# Altium PCB TuringSMD.PcbDoc (part 1 of 2)
Units mil, origin at the board's own origin, x right, y up, seen from the top; angles counter-clockwise.
Board outline 1102.36 x 3937.01 mil, 2 copper layers (Top Layer, Bottom Layer); 69 components, 85 nets, 266 pads, 122 vias.
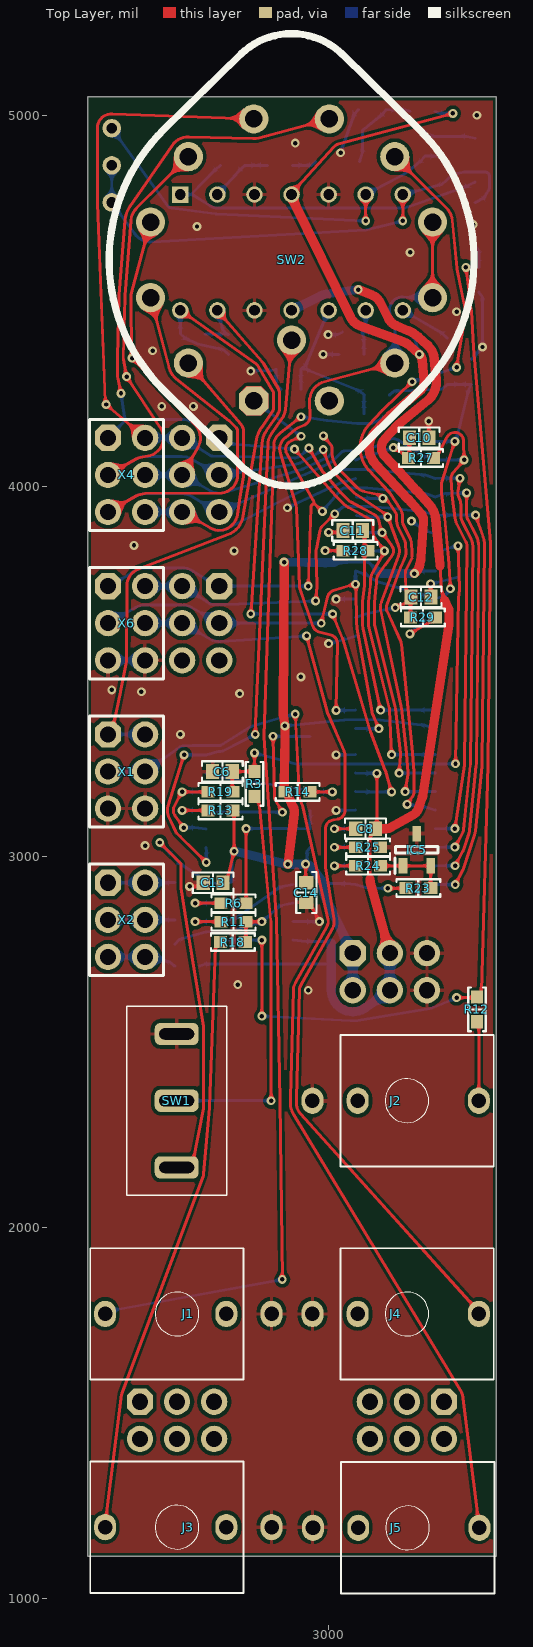
[diagram p0: Top Layer view]
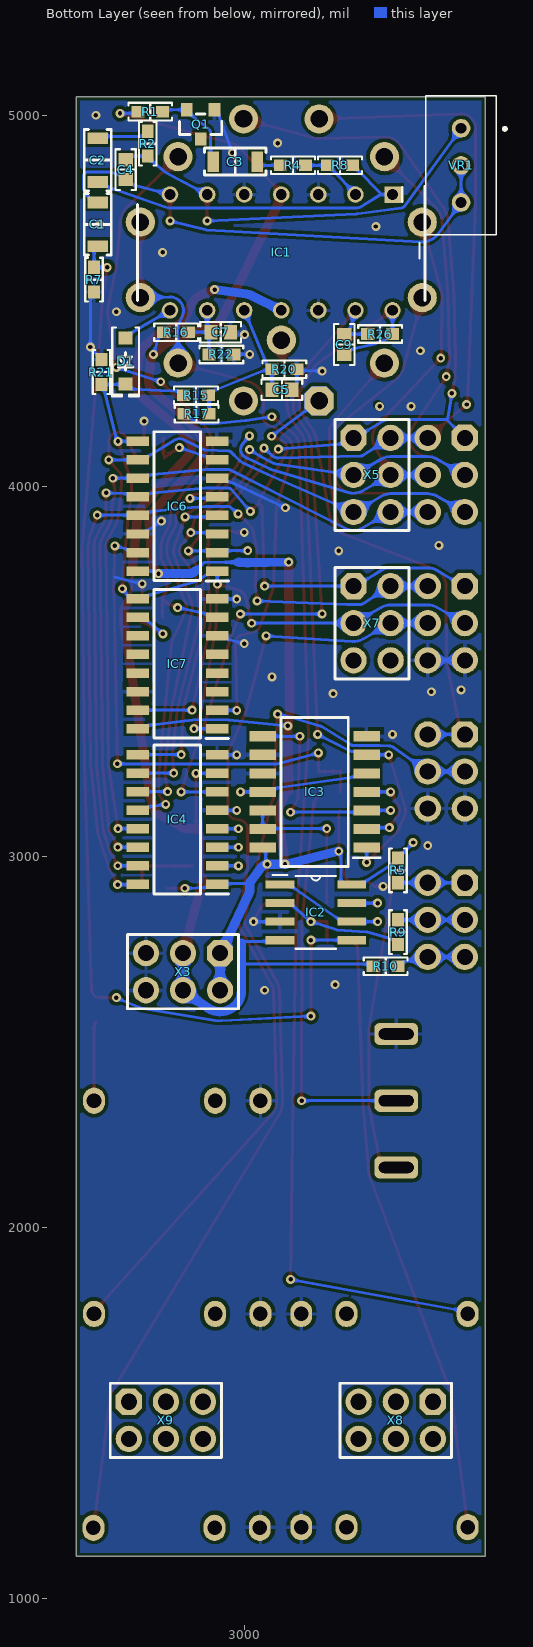
[diagram p1: Bottom Layer view, seen from below]
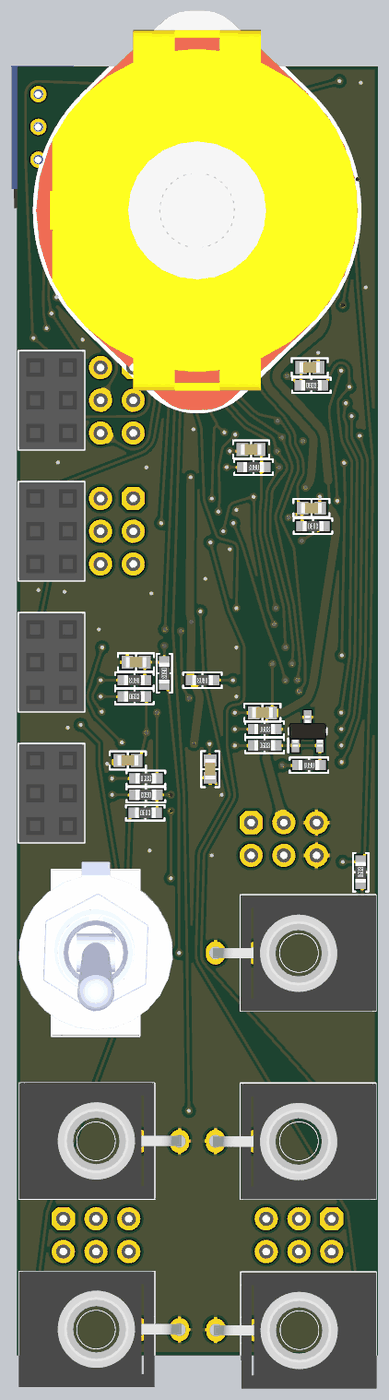
[diagram p3: 3D render of the assembled board from above, using the file's embedded part models]
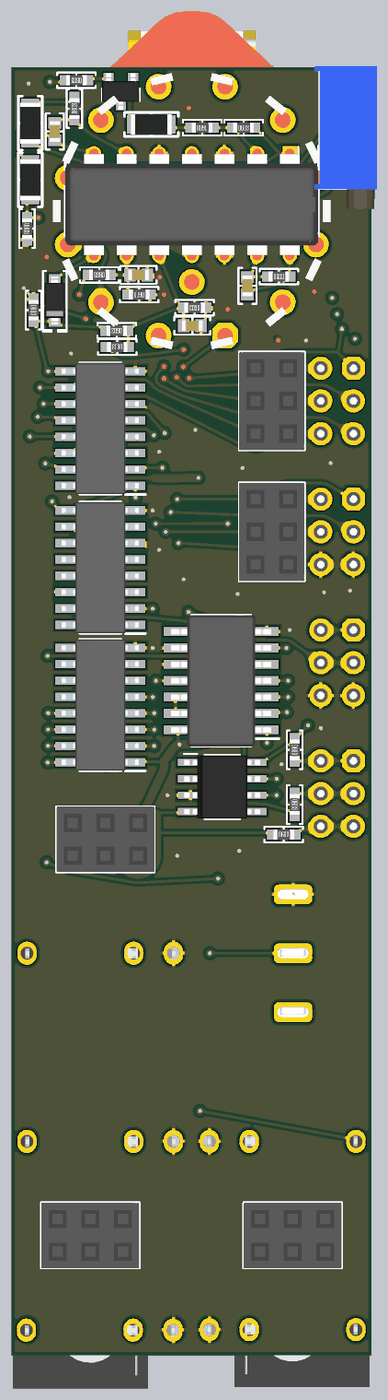
[diagram p4: 3D render of the assembled board from below, using the file's embedded part models]

## Layer stack, top to bottom
Top Solder: solder mask 0.4, Solder Resist, Dk 3.5
Top Layer: signal copper 1.4
Dielectric 1: dielectric 12.6, FR-4, Dk 4.8
Bottom Layer: signal copper 1.4
Bottom Solder: solder mask 0.4, Solder Resist, Dk 3.5

## Board outline
2350,1112.99 2350,5050 3452.36,5050 3452.36,1112.99

## Design rules (kind name [scope] priority, off if disabled: settings)
BoardOutlineClearance [All] p1: gap=10 ignorepadtopadclearanceinfootprint=FALSE except(0: Arc-SplitContinuation Track-SplitContinuation SMDPad-SplitContinuation THPad-SplitContinuation Via-SplitContinuation Fill-SplitContinuation Poly-SplitContinuation Region-SplitContinuation Text-SplitContinuation)
Clearance [All] p1: gap=10 ignorepadtopadclearanceinfootprint=FALSE except(7: Arc-SMDPad Track-SMDPad; 8: Arc-Arc Arc-Track Arc-Via Arc-Fill Arc-Poly Arc-Region Track-Track Track-Via Track-Fill Track-Poly Track-Region SMDPad-SMDPad SMDPad-Fill SMDPad-Poly SMDPad-Region)
PolygonConnect [All] p1: thpad.connectstyle=Relief thpad.reliefconductorwidth=10 thpad.reliefentries=4 thpad.polygonreliefangle="90 Angle" thpad.airgapwidth=10 smdpad.connectstyle=Relief smdpad.reliefconductorwidth=10 smdpad.reliefentries=4 smdpad.polygonreliefangle="90 Angle" smdpad.airgapwidth=10 via.connectstyle=Direct via.reliefconductorwidth=10 via.reliefentries=4 via.polygonreliefangle="90 Angle" via.airgapwidth=10
RoutingVias [All] p1: holewidth=12 width=24 viastyle="Through Hole" minholewidth=12 minwidth=24 maxholewidth=12 maxwidth=24
SolderMaskExpansion [All] p1: expansion=4 istentingtop=FALSE
Width [All] p1: maxlimit=25 minlimit=8 preferedwidth=8
30 further rules are at their usual default settings.

## Components (designator, comment, footprint, x,y, rotation, side; value= is the part's Value field where it differs from the comment)
C1 "0.47 µF" "CAP FILM 1206" 3395,4705.94 r270 bottom
C2 "0.47 µF" "CAP FILM 1206" 3395,4879.06 r90 bottom
C3 "0.47 µF" "CAP FILM 1206" 3024.06,4875 r180 bottom
C4 "1000 pF" "CAP 0603_1608" 3320,4853.43 r270 bottom
C5 "330 pF" "CAP 0603_1608" 2898.43,4260 r0 bottom
C6 "1000 pF" "CAP 0603_1608" 2713.43,3230 r0 top
C7 "0.1 µF" "CAP 0603_1608" 3063.43,4415 r0 bottom
C8 "10000 pF" "CAP 0603_1608" 3099.65,3075.65 r180 top
C9 "1000 pF" "CAP 0603_1608" 2730,4381.57 r270 bottom
C10 "1000 pF" "CAP 0603_1608" 3244.22,4130.65 r180 top
C11 "1000 pF" "CAP 0603_1608" 3065,3880 r0 top
C12 "1000 pF" "CAP 0603_1608" 3249.22,3700.65 r180 top
C13 "0.1 µF" "CAP 0603_1608" 2688.43,2930 r0 top
C14 "0.1 µF" "CAP 0603_1608" 2940,2903.43 r90 top
D1 "1N4148W-TP" SOD-123 3320,4337.01 r270 bottom
IC1 "TL074CN" DIP794W53P254L1930H508Q14N 2900,4630 r270 bottom
IC2 "TL072ACP" SOIC-8 2807,2850 r180 bottom
IC3 "CD4016BNSR" SOIC127P780X200-14N 2810,3175 r0 bottom
IC4 "DAC0800LCM_NOPB" SOIC127P600X175-16N 3180.36,3100.65 r0 bottom
IC5 "TL431MFDT,215" SOT95P230X110-3N 3237.76,3018.95 r90 top
IC6 "CD4015BM96" SOIC127P600X175-16N 3180.36,3945.65 r0 bottom
IC7 "CD4015BM96" SOIC127P600X175-16N 3180.36,3520.65 r0 bottom
J1 "CLOCK" THONKICONN 2846.06,1766.89 r90 top
J2 "NOISE_OUT" THONKICONN 2956.3,2342.05 r270 top
J3 "CV_IN" THONKICONN 2846.06,1191.73 r90 top
J4 "PULSE_OUT" THONKICONN 2956.3,1766.89 r270 top
J5 "CV OUT" THONKICONN 2957.95,1190 r270 top
Q1 "MMBT3904-7-F" "DIODES SOT-23-3" 3117.6,4975.63 r270 bottom
R1 "100 kOhms" "YAGEO RES 0603_1608" 3253.46,5010 r0 bottom
R2 "1 kOhms" "YAGEO RES 0603_1608" 3260,4923.46 r90 bottom
R3 "1 kOhms" "YAGEO RES 0603_1608" 2800,3196.54 r270 top
R4 "10 kOhms" "YAGEO RES 0603_1608" 2868.46,4865 r0 bottom
R5 "10 kOhms" "YAGEO RES 0603_1608" 2585,2963.46 r270 bottom
R6 "100 kOhms" "YAGEO RES 0603_1608" 2743.46,2875 r0 top
R7 "100 kOhms" "YAGEO RES 0603_1608" 3405,4556.54 r270 bottom
R8 "470 kOhms" "YAGEO RES 0603_1608" 2741.54,4865 r180 bottom
R9 "100 kOhms" "YAGEO RES 0603_1608" 2585,2796.54 r270 bottom
R10 "10 kOhms" "YAGEO RES 0603_1608" 2618.46,2705 r180 bottom
R11 "47 kOhms" "YAGEO RES 0603_1608" 2743.46,2825 r180 top
R12 "1 kOhms" "YAGEO RES 0603_1608" 3400,2588.46 r90 top
R13 "10 kOhms" "YAGEO RES 0603_1608" 2708.46,3125 r0 top
R14 "10 kOhms" "YAGEO RES 0603_1608" 2916.54,3175 r180 top
R15 "470 kOhms" "YAGEO RES 0603_1608" 3130,4245 r0 bottom
R16 "68 kOhms" "YAGEO RES 0603_1608" 3183.46,4415 r0 bottom
R17 "15 kOhms" "YAGEO RES 0603_1608" 3128.46,4195 r0 bottom
R18 "51 kOhms" "YAGEO RES 0603_1608" 2741.54,2770 r0 top
R19 "10 kOhms" "YAGEO RES 0603_1608" 2708.46,3175 r180 top
R20 "100 kOhms" "YAGEO RES 0603_1608" 2891.54,4315 r0 bottom
R21 "10 kOhms" "YAGEO RES 0603_1608" 3385,4307.48 r270 bottom
R22 "15 kOhms" "YAGEO RES 0603_1608" 3061.54,4355 r0 bottom
R23 "3.3 kOhms" "YAGEO RES 0603_1608" 3241.9,2915.65 r180 top
R24 "1.6 kOhms" "YAGEO RES 0603_1608" 3106.54,2975.65 r0 top
R25 "1.6 kOhms" "YAGEO RES 0603_1608" 3106.54,3025.65 r0 top
R26 "5.1 kOhms" "YAGEO RES 0603_1608" 2633.46,4410 r180 bottom
R27 "10 kOhms" "YAGEO RES 0603_1608" 3249.18,4075.65 r0 top
R28 "10 kOhms" "YAGEO RES 0603_1608" 3072.68,3825.65 r180 top
R29 "10 kOhms" "YAGEO RES 0603_1608" 3254.18,3645.65 r0 top
SW1 "Toggle SW" "TOGGLE SW" 2590,2342.05 r0 top
SW2 "SW Rotary" SW_ROTARY 2900,4610 r180 top
VR1 "1meg" 3296X1223LF 2415,4865 r0 bottom
X1 "Connector, 6pin, 2.54mm, 500VAC, 3A" "CON: PBD-6"#1 2455,3230 r270 top
X2 "Connector, 6pin, 2.54mm, 500VAC, 3A" "CON: PBD-6"#1 2455,2830 r270 top
X3 "Connector, 6pin, 2.54mm, 500VAC, 3A" "CON: PBD-6"#1 3165,2690 r0 bottom
X4 "Connector, 6pin, 2.54mm, 500VAC, 3A" "CON: PBD-6"#1 2455,4030 r270 top
X5 "Connector, 6pin, 2.54mm, 500VAC, 3A" "CON: PBD-6"#1 2655,4030 r270 bottom
X6 "Connector, 6pin, 2.54mm, 500VAC, 3A" "CON: PBD-6"#1 2455,3630 r270 top
X7 "Connector, 6pin, 2.54mm, 500VAC, 3A" "CON: PBD-6"#1 2655,3630 r270 bottom
X8 "Connector, 6pin, 2.54mm, 500VAC, 3A" "CON: PBD-6"#1 2591.14,1480 r0 bottom
X9 "Connector, 6pin, 2.54mm, 500VAC, 3A" "CON: PBD-6"#2 3211.22,1480 r180 bottom

## Footprints (in the part's own frame and the unit in brackets; to place one, negate y for a bottom-side part, rotate by r counter-clockwise, add the part's x,y. Pads: shape width x height; smd on the part's side, far side on the other; paste and mask are expansions set on the pad)
3296X1223LF [mm]
  round 1.269 hole 0.74: 1(0,-2.54) 2(0,0) 3(0,2.54)
  silkscreen extent -3.1,-4.76 2.41,4.76, body extent -2.07,-4.75 2.76,6.3, height 10.03
"CAP 0603_1608" [mm] "Chip Capacitor, 2-Leads, Body 1.60x0.80mm, IPC Medium Density"
  rect 0.9x1 smd: 1(-0.675,0) 2(0.675,0)
  silkscreen extent -1.4,-0.7 1.4,0.7, body extent -0.8,-0.41 0.8,0.41, height 0.82
"CAP FILM 1206" [mm] "H1, Film Capacitor PPS, 2-Leads, Body 3.20x1.60mm, IPC Medium Density"
  rect 0.8x1.4 smd: 1(-1.5,0) 2(1.5,0)
  silkscreen extent -2.1,-0.92 2.1,0.92, body extent -1.6,-0.8 1.6,0.8, height 1
"CON: PBD-6"#1 [mm] "PBD-6"
  oct 1.8x1.8 hole 1.1: 1(-2.54,-1.27)
  round 1.8 hole 1.1: 2(-2.54,1.27) 3(0,-1.27) 4(0,1.27) 5(2.54,-1.27) 6(2.54,1.27)
  silkscreen extent -3.81,-2.54 3.81,2.54, body extent -3.81,-2.54 3.81,2.54, height 8.5
"CON: PBD-6"#2 [mm] "PBD-6"
  oct 1.8x1.8 hole 1.1: 1(-2.54,1.27)
  round 1.8 hole 1.1: 2(-2.54,-1.27) 3(0,1.27) 4(0,-1.27) 5(2.54,1.27) 6(2.54,-1.27)
  silkscreen extent -3.81,-2.54 3.81,2.54, body extent -3.81,-2.54 3.81,2.54, height 8.5
"DIODES SOT-23-3" [mm] "SOT23, 3-Leads, Body 2.90x2.40mm, Pitch 0.95mm, IPC Medium Density"
  rect 0.9x0.8 smd: 1(-1,0.95) 2(-1,-0.95) 3(1,0)
  silkscreen extent -0.7,-1.45 0.7,1.45, body extent -1.41,-1.45 1.41,1.45, height 1.5
DIP794W53P254L1930H508Q14N [mm]
  rect 1.13x1.13 hole 0.73: 1(-3.97,7.62)
  round 1.13 hole 0.73: 2(-3.97,5.08) 3(-3.97,2.54) 4(-3.97,0) 5(-3.97,-2.54) 6(-3.97,-5.08) 7(-3.97,-7.62) 8(3.97,-7.62) 9(3.97,-5.08) 10(3.97,-2.54) 11(3.97,0) 12(3.97,2.54) 13(3.97,5.08) 14(3.97,7.62)
  silkscreen extent -4.53,-9.84 3.3,9.84, body extent -3.94,-9.84 3.94,9.84, height 5.27
SOD-123 [mm] "SOD, 2-Leads, Body 1.55x3.70mm, IPC Medium Density"
  rect 0.9x0.95 smd: 1(-1.575,0) 2(1.575,0)
  silkscreen extent -2.3,-0.92 2.41,0.92, body extent -1.86,-0.78 1.86,0.77, height 1.35
SOIC127P600X175-16N [mm]
  rect 1.55x0.65 smd: 1(-2.725,4.445) 2(-2.725,3.175) 3(-2.725,1.905) 4(-2.725,0.635) 5(-2.725,-0.635) 6(-2.725,-1.905) 7(-2.725,-3.175) 8(-2.725,-4.445) 9(2.725,-4.445) 10(2.725,-3.175) 11(2.725,-1.905) 12(2.725,-0.635) 13(2.725,0.635) 14(2.725,1.905) 15(2.725,3.175) 16(2.725,4.445)
  silkscreen extent -3.5,-5.1 1.6,5.12, body extent -3,-5.1 3,5.1, height 1.75
SOIC127P780X200-14N [mm]
  rect 1.825x0.7 smd: 1(-3.562,3.81) 2(-3.562,2.54) 3(-3.562,1.27) 4(-3.562,0) 5(-3.562,-1.27) 6(-3.562,-2.54) 7(-3.562,-3.81) 8(3.562,-3.81) 9(3.562,-2.54) 10(3.562,-1.27) 11(3.562,0) 12(3.562,1.27) 13(3.562,2.54) 14(3.562,3.81)
  silkscreen extent -4.47,-5.1 2.3,5.1, body extent -3.9,-5.1 3.9,5.1, height 2
SOIC-8 [mil]
  rect 78x22 smd: 1(-97,75) 2(-97,25) 3(-97,-25) 4(-97,-75) 5(97,-75) 6(97,-25) 7(97,25) 8(97,75)
  silkscreen extent -117,-98 54,101, body extent -116,-96 116,96, height 65
SOT95P230X110-3N [mm]
  rect 1.05x0.6 smd: 1(-1.1,0.95) 2(-1.1,-0.95) 3(1.1,0)
  silkscreen extent -1.63,-1.45 0.23,1.5, body extent -1.2,-1.45 1.2,1.45, height 0.95
SW_ROTARY [mm] "RS25 rotary switch from ali"
  oct 2x2 hole 1.2: 1(2.588,9.659)
  round 2 hole 1.2: 2(7.071,7.071) 3(9.659,2.588) 4(9.659,-2.588) 5(7.071,-7.071) 6(2.588,-9.659) 7(-2.588,-9.659) 8(-7.071,-7.071) 9(-9.659,-2.588) 10(-9.659,2.588) 11(-7.071,7.071) 12(-2.588,9.659) A(0,5.5)
  Top Layer region: 1.588,10.159 2.088,10.659 3.088,10.659 3.588,10.159 3.588,9.159 3.088,8.659 2.088,8.659 1.588,9.159
  Bottom Layer region: 1.588,10.159 2.088,10.659 3.088,10.659 3.588,10.159 3.588,9.159 3.088,8.659 2.088,8.659 1.588,9.159
  silkscreen extent -12.5,-15.5 12.5,15.5, body extent -12.5,-15.5 12.5,15.5, height 31
THONKICONN [mm]
  oval 1.8x1.5 hole 1: 1(0,0) 2(0,3.1) 3(0,11.4)
  silkscreen extent -4.5,1.93 4.5,12.42, body extent -4.47,-0.18 4.53,12.45, height 14.5
"TOGGLE SW" [mil] "3 PIN TOGGLE SWITCH SPDT"
  rrect50% 118.11x60 hole 30 slot 94.49 at 0 deg: 1(0,180) 2(0,0) 3(0,-180)
  silkscreen extent -135,-255 135,255, body extent -236,-251 237,278, height 1129
"YAGEO RES 0603_1608" [mm] "Chip Resistor, 2-Leads, Body 1.60x0.80mm"
  rect 0.9x0.8 smd: 1(-0.85,0) 2(0.85,0)
  silkscreen extent -1.5,-0.6 1.5,0.6, body extent -0.8,-0.4 0.8,0.4, height 0.45

## Part data
C1 C2 C3: library part ECP-U1C474MA5, "CAP FILM 0.47UF 20% 16VDC 1206", Device Package="1206 (3216 Metric)", Dielectric Material="Acrylic, Metallized - Stacked", Manufacturer="Panasonic Electronic Components", Operating Temperature="-40°C ~ 85°C", Supplier Part Number 1=PCF1130CT-ND, Tolerance=±20%, Voltage Rating - AC=12V, Voltage Rating - DC=16V, Applications="EMI, RFI Suppression", Capacitance="0.47 µF", ComponentLink1Description=Datasheet, ComponentLink1URL=http://industrial.panasonic.com/www-cgi/jvcr13pz.cgi?E+PZ+3+ABD0012+ECPU1C474MA5+7+WW, ComponentLink2Description="DigiKey Link", ComponentLink2URL=https://www.digikey.com/en/products/detail/panasonic-electronic-components/ECP-U1C474MA5/285450, Features="Low ESR", Height - Seated (Max)="0.063\" (1.60mm)", LastUpdated="6/3/2024 8:14:42 PM", Lifecycle Status=Active, Minimum Order=1, Mounting Type="Surface Mount", Package / Case="1206 (3216 Metric)", Packaging=TapeAndReel, Part Number=ECP-U1C474MA5, Part Status=Active, Price=0.22, Series=ECP-U(A), Size / Dimension="0.126\" L x 0.063\" W (3.20mm x 1.60mm)", Supplier 1=DigiKey, Termination="Solder Pads"
C4 C6 C9 C10 C11 C12: library part C1608X8R1H102K080AA, "CAP CER 1000PF 50V X8R 0603", Device Package="0603 (1608 Metric)", Manufacturer="TDK Corporation", Operating Temperature="-55°C ~ 150°C", Supplier Part Number 1=445-2501-1-ND, Temperature Coefficient=X8R, Tolerance=±10%, Voltage - Rated=50V, Applications="General Purpose", Capacitance="1000 pF", ComponentLink1Description=Datasheet, ComponentLink1URL=https://product.tdk.com/info/en/catalog/datasheets/mlcc_commercial_hightemp_en.pdf?ref_disty=digikey, ComponentLink2Description="DigiKey Link", ComponentLink2URL=https://www.digikey.com/en/products/detail/tdk-corporation/C1608X8R1H102K080AA/927127, Features="High Temperature", LastUpdated="2/9/2024 8:10:30 PM", Lifecycle Status=Active, Minimum Order=1, Mounting Type="Surface Mount, MLCC", Package / Case="0603 (1608 Metric)", Packaging=TapeAndReel, Part Number=C1608X8R1H102K080AA, Part Status=Active, PartId=2708, Price=0.01, Series=C, Size / Dimension="0.063\" L x 0.031\" W (1.60mm x 0.80mm)", Supplier 1=DigiKey, Thickness (Max)="0.035\" (0.90mm)"
C5: library part AC0603JRNPO9BN331, "CAP CER 330PF 50V C0G/NPO 0603", Device Package="0603 (1608 Metric)", Manufacturer=Yageo, Operating Temperature="-55°C ~ 125°C", Ratings=AEC-Q200, Supplier Part Number 1=311-3280-1-ND, Temperature Coefficient="C0G, NP0", Tolerance=±5%, Voltage - Rated=50V, Applications=Automotive, Capacitance="330 pF", ComponentLink1Description=Datasheet, ComponentLink1URL=http://www.yageo.com/NewPortal/_en/search/productDocs.jsp?YageoPartNumber=AC0603JRNPO9BN331, ComponentLink2Description="DigiKey Link", ComponentLink2URL=https://www.digikey.com/en/products/detail/yageo/AC0603JRNPO9BN331/6643266, LastUpdated="2/9/2024 8:10:30 PM", Lifecycle Status=Active, Minimum Order=1, Mounting Type="Surface Mount, MLCC", Package / Case="0603 (1608 Metric)", Packaging=TapeAndReel, Part Number=AC0603JRNPO9BN331, Part Status=Active, PartId=2321, Price=0.01, Series=AC, Size / Dimension="0.063\" L x 0.031\" W (1.60mm x 0.80mm)", Supplier 1=DigiKey, Thickness (Max)="0.035\" (0.90mm)"
C7 C13 C14: library part C0603C104K5RAC7411, "CAP CER 0.1UF 50V X7R 0603", Device Package="0603 (1608 Metric)", Manufacturer=KEMET, Operating Temperature="-55°C ~ 125°C", Supplier Part Number 1=399-C0603C104K5RAC7411CT-ND, Temperature Coefficient=X7R, Tolerance=±10%, Voltage - Rated=50V, Applications="Bypass, Decoupling", Capacitance="0.1 µF", ComponentLink1Description=Datasheet, ComponentLink1URL=https://api.kemet.com/component-edge/download/datasheet/C0603C104K5RAC7411.pdf, ComponentLink2Description="DigiKey Link", ComponentLink2URL=https://www.digikey.com/en/products/detail/kemet/C0603C104K5RAC7411/3317013, LastUpdated="2/9/2024 8:10:30 PM", Lifecycle Status=Active, Minimum Order=1, Mounting Type="Surface Mount, MLCC", Package / Case="0603 (1608 Metric)", Packaging=TapeAndReel, Part Number=C0603C104K5RAC7411, Part Status=Active, PartId=2233, Price=0.01, Series="SMD Comm X7R", Size / Dimension="0.063\" L x 0.031\" W (1.60mm x 0.80mm)", Supplier 1=DigiKey, Thickness (Max)="0.035\" (0.90mm)"
C8: library part CGA3E2X8R1H103K080AA, "CAP CER 10000PF 50V X8R 0603", Device Package="0603 (1608 Metric)", Manufacturer="TDK Corporation", Operating Temperature="-55°C ~ 150°C", Ratings=AEC-Q200, Supplier Part Number 1=445-5892-1-ND, Temperature Coefficient=X8R, Tolerance=±10%, Voltage - Rated=50V, Applications=Automotive, Capacitance="10000 pF", ComponentLink1Description=Datasheet, ComponentLink1URL=https://product.tdk.com/info/en/catalog/datasheets/mlcc_automotive_hightemp_en.pdf?ref_disty=digikey, ComponentLink2Description="DigiKey Link", ComponentLink2URL=https://www.digikey.com/en/products/detail/tdk-corporation/CGA3E2X8R1H103K080AA/2443370, Features="High Temperature", LastUpdated="2/9/2024 8:10:29 PM", Lifecycle Status=Active, Minimum Order=1, Mounting Type="Surface Mount, MLCC", Package / Case="0603 (1608 Metric)", Packaging=TapeAndReel, Part Number=CGA3E2X8R1H103K080AA, Part Status=Active, PartId=2732, Price=0.01, Series=CGA, Size / Dimension="0.063\" L x 0.031\" W (1.60mm x 0.80mm)", Supplier 1=DigiKey, Thickness (Max)="0.035\" (0.90mm)"
D1: "DIODE GEN PURP 100V 150MA SOD123", Capacitance @ Vr, F="2pF @ 0V, 1MHz", Current - Average Rectified (Io)=150mA, Current - Reverse Leakage @ Vr="1 µA @ 75 V", Manufacturer="Micro Commercial Co", Operating Temperature - Junction="-65°C ~ 150°C", Package / Case=SOD-123, Supplier Part Number 1=1N4148WTPMSCT-ND, Voltage - DC Reverse (Vr) (Max)="100 V", Voltage - Forward (Vf) (Max) @ If="1.25 V @ 150 mA", ComponentLink1Description=Datasheet, ComponentLink1URL=https://www.mccsemi.com/pdf/Products/1N4148W(SOD123).pdf, ComponentLink2Description="DigiKey Link", ComponentLink2URL=https://www.digikey.com/en/products/detail/micro-commercial-co/1N4148W-TP/717196, Diode Type=Standard, LastUpdated="6/3/2024 7:54:46 PM", Lifecycle Status=Active, Minimum Order=1, Mounting Type="Surface Mount", Packaging=TapeAndReel, Part Number=1N4148W-TP, Part Status=Active, PartId=999, Price=0.01, Reverse Recovery Time (trr)="4 ns", Series=-, Speed="Small Signal =< 200mA (Io), Any Speed", Supplier 1=DigiKey, Supplier Device Package=SOD-123
IC1: "Integrated Circuit", Manufacturer_Name="Texas Instruments", Mouser Part Number=595-TL074CN, Arrow Part Number=TL074CN, Arrow Price/Stock=https://www.arrow.com/en/products/tl074cn/texas-instruments?utm_currency=USD&region=nac, Datasheet Link=https://www.ti.com/lit/ds/symlink/tl074.pdf?HQS=TI-null-null-mousermode-df-pf-null-wwe&ts=1598513500878&ref_url=https%253A%252F%252Feu.mouser.com%252F, Height=5.08mm, Manufacturer_Part_Number=TL074CN, Mouser Price/Stock=https://www.mouser.co.uk/ProductDetail/Texas-Instruments/TL074CN?qs=AMJt07B76uv7dLYnj7iLiQ%3D%3D
IC2: "Integrated Circuit", Manufacturer_Name="Texas Instruments", Mouser Part Number=595-TL072ACP, Arrow Part Number=TL072ACP, Arrow Price/Stock=https://www.arrow.com/en/products/tl072acp/texas-instruments?utm_currency=USD&region=europe, Datasheet Link=http://www.ti.com/lit/ds/symlink/tl071a.pdf, Height=5.08mm, Manufacturer_Part_Number=TL072ACP, Mouser Price/Stock=https://www.mouser.co.uk/ProductDetail/Texas-Instruments/TL072ACP?qs=0OT4q4QBUTLFvIZ%252B%2FvrwoQ%3D%3D
IC3: "Integrated Circuit", Manufacturer_Name="Texas Instruments", Mouser Part Number=595-CD4016BNSR, Arrow Part Number=CD4016BNSR, Arrow Price/Stock=https://www.arrow.com/en/products/cd4016bnsr/texas-instruments?utm_currency=USD&region=nac, Datasheet Link=https://www.ti.com/lit/ds/symlink/cd4016b.pdf?ts=1617176409786&ref_url=https%253A%252F%252Fwww.ti.com%252Fstore%252Fti%252Fen%252Fp%252Fproduct%252F%253Fp%253DCD4016BNSR%2526keyMatch%253DCD4016BNSR%2526tisearch%253Dsearch-everything%2526usecase%253DOPN, Height=2mm, Manufacturer_Part_Number=CD4016BNSR, Mouser Price/Stock=https://www.mouser.co.uk/ProductDetail/Texas-Instruments/CD4016BNSR?qs=DXdcjUGny5PNUtZB%252BpoaOA%3D%3D
IC4: "Integrated Circuit", Arrow Part Number=DAC0800LCM/NOPB, Manufacturer_Name="Texas Instruments", Mouser Part Number=926-DAC0800LCM/NOPB, Arrow Price/Stock=https://www.arrow.com/en/products/dac0800lcmnopb/texas-instruments?utm_currency=USD&region=europe, Datasheet Link=http://www.ti.com/lit/ds/symlink/dac0800.pdf, Height=1.75mm, Manufacturer_Part_Number=DAC0800LCM/NOPB, Mouser Price/Stock=https://www.mouser.co.uk/ProductDetail/Texas-Instruments/DAC0800LCM-NOPB?qs=7X5t%252BdzoRHB3UMLDAB6Vww%3D%3D
IC5: "Integrated Circuit", Manufacturer_Name=Nexperia, Mouser Part Number=771-TL431MFDT215, Arrow Part Number=TL431MFDT,215, Arrow Price/Stock=https://www.arrow.com/en/products/tl431mfdt215/nexperia?utm_currency=USD&region=nac, Datasheet Link=https://assets.nexperia.com/documents/data-sheet/TL431_FAM.pdf, Height=1.1mm, Manufacturer_Part_Number=TL431MFDT,215, Mouser Price/Stock=https://www.mouser.co.uk/ProductDetail/Nexperia/TL431MFDT215?qs=A1cBxND5mHKvFzVl3lBdcQ%3D%3D
IC6 IC7: "Integrated Circuit", Manufacturer_Name="Texas Instruments", Mouser Part Number=595-CD4015BM96, Arrow Part Number=CD4015BM96, Arrow Price/Stock=https://www.arrow.com/en/products/cd4015bm96/texas-instruments?region=nac, Datasheet Link=http://www.ti.com/general/docs/lit/getliterature.tsp?genericPartNumber=CD4015B&&fileType=pdf, Height=1.75mm, Manufacturer_Part_Number=CD4015BM96, Mouser Price/Stock=https://www.mouser.co.uk/ProductDetail/Texas-Instruments/CD4015BM96?qs=vmM6vcLFxxH3zP0zlXu8Qg%3D%3D
J1 J2 J3 J4 J5: library part PJ-301M-3P, "THONKICONN metal"
Q1: "TRANS NPN 40V 0.2A SOT23-3", Current - Collector (Ic) (Max)="200 mA", Current - Collector Cutoff (Max)="50nA (ICBO)", DC Current Gain (hFE) (Min) @ Ic, Vce="100 @ 10mA, 1V", Frequency - Transition=300MHz, Manufacturer="Diodes Incorporated", Operating Temperature="-55°C ~ 150°C (TJ)", Package / Case="TO-236-3, SC-59, SOT-23-3", Power - Max="300 mW", Supplier Device Package=SOT-23-3, Supplier Part Number 1=MMBT3904-FDICT-ND, Voltage - Collector Emitter Breakdown (Max)="40 V", ComponentLink1Description=Datasheet, ComponentLink1URL=https://www.diodes.com/assets/Datasheets/ds30036.pdf, ComponentLink2Description="DigiKey Link", ComponentLink2URL=https://www.digikey.com/en/products/detail/diodes-incorporated/MMBT3904-7-F/814494, LastUpdated="6/3/2024 8:24:11 PM", Lifecycle Status=Active, Minimum Order=1, Mounting Type="Surface Mount", Packaging=TapeAndReel, Part Number=MMBT3904-7-F, Part Status=Active, PartId=85, Price=0.01, Series=-, Supplier 1=DigiKey, Transistor Type=NPN, Vce Saturation (Max) @ Ib, Ic="300mV @ 5mA, 50mA"
R1 R6 R7 R9 R20: library part AA0603FR-07100KL, "RES SMD 100K OHM 1% 1/10W 0603", Device Package="0603 (1608 Metric)", Manufacturer=Yageo, Operating Temperature="-55°C ~ 155°C", Power (Watts)="0.1W, 1/10W", Ratings=AEC-Q200, Supplier Device Package=0603, Supplier Part Number 1=13-AA0603FR-07100KLCT-ND, Temperature Coefficient=±150ppm/°C, Tolerance=±1%, ComponentLink1Description=Datasheet, ComponentLink1URL=https://www.yageo.com/upload/media/product/productsearch/datasheet/rchip/PYu-AA_51_RoHS_L_3.pdf, ComponentLink2Description="DigiKey Link", ComponentLink2URL=https://www.digikey.com/en/products/detail/yageo/AA0603FR-07100KL/5888687, Composition="Thick Film", Features="Anti-Sulfur, Automotive AEC-Q200, Moisture Resistant", Height - Seated (Max)="0.022\" (0.55mm)", LastUpdated="7/25/2024 9:19:03 AM", Lifecycle Status=Active, Minimum Order=1, Number of Terminations=2, Package / Case="0603 (1608 Metric)", Packaging=TapeAndReel, Part Number=AA0603FR-07100KL, PartId=78895, Price=0.01, Resistance="100 kOhms", Series=AA, Size / Dimension="0.063\" L x 0.031\" W (1.60mm x 0.80mm)", Supplier 1=DigiKey
R2 R3 R12: library part AA0603FR-071KL, "RES SMD 1K OHM 1% 1/10W 0603", Device Package="0603 (1608 Metric)", Manufacturer=Yageo, Operating Temperature="-55°C ~ 155°C", Power (Watts)="0.1W, 1/10W", Ratings=AEC-Q200, Supplier Device Package=0603, Supplier Part Number 1=13-AA0603FR-071KLCT-ND, Temperature Coefficient=±150ppm/°C, Tolerance=±1%, ComponentLink1Description=Datasheet, ComponentLink1URL=https://www.yageo.com/upload/media/product/productsearch/datasheet/rchip/PYu-AA_51_RoHS_L_3.pdf, ComponentLink2Description="DigiKey Link", ComponentLink2URL=https://www.digikey.com/en/products/detail/yageo/AA0603FR-071KL/5888847, Composition="Thick Film", Features="Anti-Sulfur, Automotive AEC-Q200, Moisture Resistant", Height - Seated (Max)="0.022\" (0.55mm)", LastUpdated="7/25/2024 9:19:15 AM", Lifecycle Status=Active, Minimum Order=1, Number of Terminations=2, Package / Case="0603 (1608 Metric)", Packaging=TapeAndReel, Part Number=AA0603FR-071KL, Part Status=Active, PartId=64335, Price=0.01, Resistance="1 kOhms", Series=AA, Size / Dimension="0.063\" L x 0.031\" W (1.60mm x 0.80mm)", Supplier 1=DigiKey
R4 R5 R10 R13 R14 R19 R21 R27 R28 R29: library part AA0603FR-0710KL, "RES SMD 10K OHM 1% 1/10W 0603", Device Package="0603 (1608 Metric)", Manufacturer=Yageo, Operating Temperature="-55°C ~ 155°C", Power (Watts)="0.1W, 1/10W", Ratings=AEC-Q200, Supplier Device Package=0603, Supplier Part Number 1=13-AA0603FR-0710KLCT-ND, Temperature Coefficient=±150ppm/°C, Tolerance=±1%, ComponentLink1Description=Datasheet, ComponentLink1URL=https://www.yageo.com/upload/media/product/productsearch/datasheet/rchip/PYu-AA_51_RoHS_L_3.pdf, ComponentLink2Description="DigiKey Link", ComponentLink2URL=https://www.digikey.com/en/products/detail/yageo/AA0603FR-0710KL/5888698, Composition="Thick Film", Features="Anti-Sulfur, Automotive AEC-Q200, Moisture Resistant", Height - Seated (Max)="0.022\" (0.55mm)", LastUpdated="7/25/2024 9:19:15 AM", Lifecycle Status=Active, Minimum Order=1, Number of Terminations=2, Package / Case="0603 (1608 Metric)", Packaging=TapeAndReel, Part Number=AA0603FR-0710KL, Part Status=Active, PartId=64302, Price=0.01, Resistance="10 kOhms", Series=AA, Size / Dimension="0.063\" L x 0.031\" W (1.60mm x 0.80mm)", Supplier 1=DigiKey
R8 R15: library part AC0603FR-07470KL, "RES SMD 470K OHM 1% 1/10W 0603", Device Package="0603 (1608 Metric)", Manufacturer=Yageo, Operating Temperature="-55°C ~ 155°C", Power (Watts)="0.1W, 1/10W", Ratings=AEC-Q200, Supplier Device Package=0603, Supplier Part Number 1=YAG3609CT-ND, Temperature Coefficient=±100ppm/°C, Tolerance=±1%, ComponentLink1Description=Datasheet, ComponentLink1URL=https://www.yageo.com/upload/media/product/productsearch/datasheet/rchip/PYu-AC_51_RoHS_L_7.pdf, ComponentLink2Description="DigiKey Link", ComponentLink2URL=https://www.digikey.com/en/products/detail/yageo/AC0603FR-07470KL/5896138, Composition="Thick Film", Features="Automotive AEC-Q200, Moisture Resistant", Height - Seated (Max)="0.022\" (0.55mm)", LastUpdated="7/25/2024 9:19:25 AM", Lifecycle Status=Active, Minimum Order=1, Number of Terminations=2, Package / Case="0603 (1608 Metric)", Packaging=CutTape, Part Number=AC0603FR-07470KL, Part Status=Active, PartId=15826, Price=0.01, Resistance="470 kOhms", Series=AC, Size / Dimension="0.063\" L x 0.031\" W (1.60mm x 0.80mm)", Supplier 1=DigiKey
R11: library part AC0603FR-0747KL, "RES SMD 47K OHM 1% 1/10W 0603", Device Package="0603 (1608 Metric)", Manufacturer=Yageo, Operating Temperature="-55°C ~ 155°C", Power (Watts)="0.1W, 1/10W", Ratings=AEC-Q200, Supplier Device Package=0603, Supplier Part Number 1=YAG3610CT-ND, Temperature Coefficient=±100ppm/°C, Tolerance=±1%, ComponentLink1Description=Datasheet, ComponentLink1URL=https://www.yageo.com/upload/media/product/productsearch/datasheet/rchip/PYu-AC_51_RoHS_L_7.pdf, ComponentLink2Description="DigiKey Link", ComponentLink2URL=https://www.digikey.com/en/products/detail/yageo/AC0603FR-0747KL/5896142, Composition="Thick Film", Features="Automotive AEC-Q200, Moisture Resistant", Height - Seated (Max)="0.022\" (0.55mm)", LastUpdated="7/25/2024 9:19:23 AM", Lifecycle Status=Active, Minimum Order=1, Number of Terminations=2, Package / Case="0603 (1608 Metric)", Packaging=CutTape, Part Number=AC0603FR-0747KL, Part Status=Active, PartId=17391, Price=0.01, Resistance="47 kOhms", Series=AC, Size / Dimension="0.063\" L x 0.031\" W (1.60mm x 0.80mm)", Supplier 1=DigiKey
R16: library part AC0603FR-0768KL, "RES SMD 68K OHM 1% 1/10W 0603", Device Package="0603 (1608 Metric)", Manufacturer=Yageo, Operating Temperature="-55°C ~ 155°C", Power (Watts)="0.1W, 1/10W", Ratings=AEC-Q200, Supplier Device Package=0603, Supplier Part Number 1=YAG3625CT-ND, Temperature Coefficient=±100ppm/°C, Tolerance=±1%, ComponentLink1Description=Datasheet, ComponentLink1URL=https://www.yageo.com/upload/media/product/productsearch/datasheet/rchip/PYu-AC_51_RoHS_L_7.pdf, ComponentLink2Description="DigiKey Link", ComponentLink2URL=https://www.digikey.com/en/products/detail/yageo/AC0603FR-0768KL/5896252, Composition="Thick Film", Features="Automotive AEC-Q200, Moisture Resistant", Height - Seated (Max)="0.022\" (0.55mm)", LastUpdated="7/25/2024 9:19:23 AM", Lifecycle Status=Active, Minimum Order=1, Number of Terminations=2, Package / Case="0603 (1608 Metric)", Packaging=CutTape, Part Number=AC0603FR-0768KL, Part Status=Active, PartId=17378, Price=0.01, Resistance="68 kOhms", Series=AC, Size / Dimension="0.063\" L x 0.031\" W (1.60mm x 0.80mm)", Supplier 1=DigiKey
R17 R22: library part AA0603FR-0715KL, "RES SMD 15K OHM 1% 1/10W 0603", Device Package="0603 (1608 Metric)", Manufacturer=Yageo, Operating Temperature="-55°C ~ 155°C", Power (Watts)="0.1W, 1/10W", Ratings=AEC-Q200, Supplier Device Package=0603, Supplier Part Number 1=13-AA0603FR-0715KLCT-ND, Temperature Coefficient=±150ppm/°C, Tolerance=±1%, ComponentLink1Description=Datasheet, ComponentLink1URL=https://www.yageo.com/upload/media/product/app/datasheet/rchip/pyu-aa_51_rohs_l.pdf, ComponentLink2Description="DigiKey Link", ComponentLink2URL=https://www.digikey.com/en/products/detail/yageo/AA0603FR-0715KL/5888768, Composition="Thick Film", Features="Anti-Sulfur, Automotive AEC-Q200, Moisture Resistant", Height - Seated (Max)="0.022\" (0.55mm)", LastUpdated="7/25/2024 9:18:54 AM", Lifecycle Status=Active, Minimum Order=1, Number of Terminations=2, Package / Case="0603 (1608 Metric)", Packaging=TapeAndReel, Part Number=AA0603FR-0715KL, PartId=86832, Price=0.01, Resistance="15 kOhms", Series=AA, Size / Dimension="0.063\" L x 0.031\" W (1.60mm x 0.80mm)", Supplier 1=DigiKey
R18: library part AC0603FR-0751KL, "RES SMD 51K OHM 1% 1/10W 0603", Device Package="0603 (1608 Metric)", Manufacturer=Yageo, Operating Temperature="-55°C ~ 155°C", Power (Watts)="0.1W, 1/10W", Ratings=AEC-Q200, Supplier Device Package=0603, Supplier Part Number 1=YAG3616CT-ND, Temperature Coefficient=±100ppm/°C, Tolerance=±1%, ComponentLink1Description=Datasheet, ComponentLink1URL=https://www.yageo.com/upload/media/product/productsearch/datasheet/rchip/PYu-AC_51_RoHS_L_7.pdf, ComponentLink2Description="DigiKey Link", ComponentLink2URL=https://www.digikey.com/en/products/detail/yageo/AC0603FR-0751KL/5896179, Composition="Thick Film", Features="Automotive AEC-Q200, Moisture Resistant", Height - Seated (Max)="0.022\" (0.55mm)", LastUpdated="7/25/2024 9:19:23 AM", Lifecycle Status=Active, Minimum Order=1, Number of Terminations=2, Package / Case="0603 (1608 Metric)", Packaging=CutTape, Part Number=AC0603FR-0751KL, Part Status=Active, PartId=17419, Price=0.01, Resistance="51 kOhms", Series=AC, Size / Dimension="0.063\" L x 0.031\" W (1.60mm x 0.80mm)", Supplier 1=DigiKey
R23: library part AC0603FR-073K3L, "RES SMD 3.3K OHM 1% 1/10W 0603", Device Package="0603 (1608 Metric)", Manufacturer=Yageo, Operating Temperature="-55°C ~ 155°C", Power (Watts)="0.1W, 1/10W", Ratings=AEC-Q200, Supplier Device Package=0603, Supplier Part Number 1=YAG3605CT-ND, Temperature Coefficient=±100ppm/°C, Tolerance=±1%, ComponentLink1Description=Datasheet, ComponentLink1URL=https://www.yageo.com/upload/media/product/productsearch/datasheet/rchip/PYu-AC_51_RoHS_L_7.pdf, ComponentLink2Description="DigiKey Link", ComponentLink2URL=https://www.digikey.com/en/products/detail/yageo/AC0603FR-073K3L/5896085, Composition="Thick Film", Features="Automotive AEC-Q200, Moisture Resistant", Height - Seated (Max)="0.022\" (0.55mm)", LastUpdated="7/25/2024 9:19:25 AM", Lifecycle Status=Active, Minimum Order=1, Number of Terminations=2, Package / Case="0603 (1608 Metric)", Packaging=CutTape, Part Number=AC0603FR-073K3L, Part Status=Active, PartId=16436, Price=0.01, Resistance="3.3 kOhms", Series=AC, Size / Dimension="0.063\" L x 0.031\" W (1.60mm x 0.80mm)", Supplier 1=DigiKey
R24 R25: library part AC0603FR-071K6L, "RES SMD 1.6K OHM 1% 1/10W 0603", Device Package="0603 (1608 Metric)", Manufacturer=Yageo, Operating Temperature="-55°C ~ 155°C", Power (Watts)="0.1W, 1/10W", Ratings=AEC-Q200, Supplier Device Package=0603, Supplier Part Number 1=13-AC0603FR-071K6LCT-ND, Temperature Coefficient=±100ppm/°C, Tolerance=±1%, ComponentLink1Description=Datasheet, ComponentLink1URL=https://www.yageo.com/upload/media/product/productsearch/datasheet/rchip/PYu-AC_51_RoHS_L_8.pdf, ComponentLink2Description="DigiKey Link", ComponentLink2URL=https://www.digikey.com/en/products/detail/yageo/AC0603FR-071K6L/5895870, Composition="Thick Film", Features="Automotive AEC-Q200, Moisture Resistant", Height - Seated (Max)="0.022\" (0.55mm)", LastUpdated="7/25/2024 9:19:12 AM", Lifecycle Status=Active, Minimum Order=1, Number of Terminations=2, Package / Case="0603 (1608 Metric)", Packaging=CutTape, Part Number=AC0603FR-071K6L, Part Status=Active, PartId=62199, Price=0.01, Resistance="1.6 kOhms", Series=AC, Size / Dimension="0.063\" L x 0.031\" W (1.60mm x 0.80mm)", Supplier 1=DigiKey
R26: library part AC0603FR-075K1L, "RES SMD 5.1K OHM 1% 1/10W 0603", Device Package="0603 (1608 Metric)", Manufacturer=Yageo, Operating Temperature="-55°C ~ 155°C", Power (Watts)="0.1W, 1/10W", Ratings=AEC-Q200, Supplier Device Package=0603, Supplier Part Number 1=YAG3621CT-ND, Temperature Coefficient=±100ppm/°C, Tolerance=±1%, ComponentLink1Description=Datasheet, ComponentLink1URL=https://www.yageo.com/upload/media/product/productsearch/datasheet/rchip/PYu-AC_51_RoHS_L_7.pdf, ComponentLink2Description="DigiKey Link", ComponentLink2URL=https://www.digikey.com/en/products/detail/yageo/AC0603FR-075K1L/5896209, Composition="Thick Film", Features="Automotive AEC-Q200, Moisture Resistant", Height - Seated (Max)="0.022\" (0.55mm)", LastUpdated="7/25/2024 9:19:23 AM", Lifecycle Status=Active, Minimum Order=1, Number of Terminations=2, Package / Case="0603 (1608 Metric)", Packaging=CutTape, Part Number=AC0603FR-075K1L, Part Status=Active, PartId=17442, Price=0.01, Resistance="5.1 kOhms", Series=AC, Size / Dimension="0.063\" L x 0.031\" W (1.60mm x 0.80mm)", Supplier 1=DigiKey
SW1: library part "SW Toggle"
SW2: "Rotary switch"
VR1: library part 3296X-1-105LF, "Variable Resistor", Manufacturer_Name=Bourns, Mouser Part Number=652-3296X-1-105LF, Arrow Part Number=3296X-1-105LF, Arrow Price/Stock=https://www.arrow.com/en/products/3296x-1-105lf/bourns?region=nac, Datasheet Link=https://componentsearchengine.com/Datasheets/1/3296X-1-103.pdf, Height=10mm, Manufacturer_Part_Number=3296X-1-105LF, Mouser Price/Stock=https://www.mouser.co.uk/ProductDetail/Bourns/3296X-1-105LF?qs=sqUg%252BkV%252Bnc2wFy5RGGrKyA%3D%3D
X1 X2 X3 X4 X5 X6 X7 X8 X9: library part PBD-6, CurrentMax=3A, Manufacturer=Connfly, VoltageMax=500VAC, CommentText="\"Разъем\"", helpurl=https://www.chipdip.ru/product/pbd-6, Multichannel=6pin, PartNumber=PBD-6, Pitch=2.54mm, TypeConnector=Connector, ValueManufacturerPartNumber="Connector, 6pin, 2.54mm, 500VAC, 3A"

## Via types
v1: diameter 24, hole 12, Top Layer to Bottom Layer, tented both sides, 122 vias

## Nets (pads, with @x,y where several pads share a name; then routed paths per layer and width w, separated by ;. In a path a pad name is that pad's centre, name@x,y a point inside that pad or via, vN(x,y) a via of type N, cw(c..) or ccw(c..) an arc to the next point about the centre after c; other vN are vias at no path point)
+9_1: 
+9_2: 
+12: C13.2 C14.2 IC1.4 IC2.8 IC3.14 IC4.1 IC6.16 IC7.16 R1.2 R5.1 R13.2 R14.2 R16.2 R23.2 SW1.3 X3.1 X3.2 | length 5947.3
  Top Layer w8: v1(2544.44,3038.55) 2601.22,2981.77 2601.22,2916.74 ccw(c2625,2920) 2601.29,2916.26 2616.29,2821.26 ccw(c2640,2825) 2616.32,2821.07 2662.66,2541.79 cw(c2634.06,2537.05) 2663.06,2537.05 2663.06,2327.05 cw(c2634.06,2327.05) 2662.51,2321.44 2634.06,2177.05 SW1.3@2590,2162.05 ; C13.2@2715,2930 2728.72,2945.69 v1(2745,3015) 2745,3113.25 R13.2@2741.93,3125 ; IC1.4@2900,4786.3 cw(c2908,4786.3) 2902.08,4791.68 3014.38,4915.11 cw(c3032.13,4898.96) 3025.92,4922.14 v1(3335,5005) ; v1(2938,2980) 2938,2943.72 C14.2@2940,2930 ; v1(3160,2915) 3194.72,2915 R23.2@3208.43,2915.65
  Top Layer w25: v1(2880,3795) 2877.5,3385.2 ccw(c2910,3385) 2877.96,3379.52 2882.5,3352.99 2882.5,3325 cw(c2850,3325) 2882.49,3324.39 2880,3190.81 ccw(c2905,3190.34) 2880,3190.42 2880,3178.25 R14.2@2883.07,3175 2888.29,3171.75 2899.66,3145.25 ccw(c2932.28,3159.25) 2899.79,3144.95 2904.93,3133.28 cw(c2875.18,3120.18) 2907.42,3116.06 v1(2890,2980) ; IC1.4@2900,4786.3 2900.88,4779.91 ccw(c2925.65,4783.33) 2903.26,4772.2 3059.85,4453.95 ccw(c3100,4473.7) 3084.66,4431.67 3199.59,4389.73 cw(c3178.39,4331.61) 3219.62,4377.74 3243.95,4356 cw(c3227.29,4337.36) 3244.93,4355.07 v1(3245,4355) cw(c3227.36,4337.28) 3252.24,4339.7 3257.59,4284.51 cw(c3225.25,4281.34) 3245.87,4256.22 3166.6,4190.9 ccw(c3199.93,4150.33) 3161.35,4185.94 3126.53,4148.12 ccw(c3174.71,4103.75) 3126.69,4059.2 3181.68,3999.93 cw(c3146.22,3966.84) 3181.96,3999.63 3213.25,3965.59 cw(c3183.43,3938.18) 3213.54,3965.27 3247.73,3927.25 cw(c3223.56,3905.52) 3255.98,3903.26 3249.35,3807.91 cw(c3224.9,3809.61) 3249.22,3806.57 3248.59,3801.54 cw(c3224.28,3804.57) 3248.31,3799.8 3246.05,3788.43 cw(c3206.32,3796.32) 3235,3767.72 v1(3231.14,3763.86)
  Bottom Layer w8: v1(2544.44,3038.55) 2544.44,3037.48 2571.28,3010.65 2573.25,3010.65 2585,2998.9 R5.1@2585,2996.93 2596.75,2983.21 2675,2932 IC2.8@2710,2925 2739.47,2932 2739.47,3006.15 cw(c2747.47,3006.15) 2741.8,3011.8 v1(2745,3015) ; v1(2882.22,3353.27) 3041.46,3369.39 cw(c3042.57,3358.44) 3042.54,3369.44 3135.31,3369.65 cw(c3135.36,3345.65) 3138.28,3369.47 3261.13,3354.44 IC7.16@3287.65,3345.65 ; v1(2938,2980) 2940.4,2982.9 ccw(c2934.24,2988) 2942.24,2988 2942.24,3015.22 IC3.14@2950.24,3025 ; 2985,2930 2985.29,2929.71 ccw(c2990.92,2935.39) 2990.92,2927.39 3046.57,2927.39 IC4.1@3073.08,2925.65 3099.59,2916.85 v1(3160,2915) ; 3015,3794.44 3103.59,3794.44 cw(c3103.59,3783.44) 3111.37,3791.22 3131.94,3770.65 ; R16.2@3216.93,4415 3230.65,4403.25 v1(3245,4355) ; v1@3231.14,3770.65 v1(3231.14,3763.86) cw(c3239.05,3762.65) 3239.01,3770.65 IC6.16@3287.65,3770.65 ; R1.2@3286.93,5010 3300.65,5005 v1(3335,5005)
  Bottom Layer w25: v1(2745,3015) 2884.02,2980.73 ccw(c2890,3005) v1(2890,2980) 2939.65,2980 2943.87,2978.44 cw(c2935.17,2955) 2955.24,2969.9 2980.93,2935.31 2983.58,2931.76 ccw(c3003.62,2946.71) 2984.43,2930.69 2985,2930 2985,2925.84 ccw(c3010,2925.91) 2985,2925.76 2985.09,2911.19 ccw(c3010.09,2911.34) 2987.11,2901.5 2991.02,2892.44 ccw(c3013.95,2902.39) 2991.37,2891.68 3052.46,2762.93 X3.1@3065,2740 X3.2@3065,2640 ; v1(2880,3795) 2989.82,3793.15 ccw(c2990.36,3825.65) 2992.19,3793.2 3013.6,3794.4 cw(c3015,3769.44) 3015,3794.44 ; 3131.94,3770.65 3132.51,3770.14 ccw(c3149.08,3788.86) 3149.08,3763.86 v1(3231.14,3763.86)
+12_IDC: 
-12: C8.1 IC1.11 IC2.4 IC4.7 R10.1 X3.3 X3.4 | length 3408.3
  Top Layer w8: 3111.29,2940 3111.29,3041.39 cw(c3122.29,3041.39) 3111.32,3042.13 3112.51,3059.96 C8.1@3126.23,3075.65 3130,3091.33 v1(3130,3225) ; 3300.44,3785 ccw(c3308.44,3785) 3300.46,3784.48 3304.56,3721.38 ccw(c3328.51,3722.94) 3305.48,3716.2 3313.01,3690.44
  Top Layer w25: v1(3080,4530) 3116.72,4515.2 cw(c3100,4473.7) 3140.04,4493.67 3159.96,4453.73 ccw(c3200,4473.7) 3182.96,4432.33 3214.51,4419.33 cw(c3178.39,4331.61) 3241.62,4402.33 3265.94,4380.6 cw(c3227.29,4337.36) 3268.5,4378.17 cw(c3227.41,4337.24) 3285.14,4342.77 3290.45,4287.61 cw(c3225.25,4281.34) 3266.9,4230.79 3187.53,4165.38 ccw(c3199.93,4150.33) 3185.58,4163.54 3150.8,4125.76 ccw(c3174.71,4103.75) 3150.89,4081.65 3205.9,4022.35 cw(c3146.22,3966.84) 3206.23,4021.99 3237.6,3987.86 cw(c3183.43,3938.18) 3238.08,3987.33 3272.22,3949.37 cw(c3223.56,3905.52) 3288.78,3911.58 3300.33,3787.31 cw(c3275.44,3785) 3300.44,3785 ; 3111.29,2940 ccw(c3136.29,2940) 3112.17,2933.41 X3.3@3165,2740 ; C8.1@3126.23,3075.65 3155,3075.65 ccw(c3155,3100.65) 3167.28,3078.87 3227.62,3112.91 ccw(c3211.66,3141.21) 3242.42,3130.72 3252.4,3159.98 ccw(c3206.5,3175.65) 3254.44,3168.31 3324.64,3626.95 ccw(c3305.36,3629.9) 3324.86,3629.9 3324.86,3661.39 ccw(c3305.36,3661.39) 3322.93,3669.86 3313.01,3690.44
  Bottom Layer w8: R10.1@2651.93,2705 2665.65,2710.31 2999.07,2710.31 ccw(c2999.07,2718.31) 3004.71,2712.64 3007.07,2715 ; IC2.4@2904,2775 2939,2771.72 2999.07,2771.72 cw(c2999.07,2763.72) 3004.72,2769.38 3007.07,2767.04 ; IC4.7@3073.08,3225.65 3099.59,3225 v1(3130,3225)
  Bottom Layer w25: IC1.11@2900,4473.7 2979.98,4513.72 cw(c3000,4473.7) 2993.84,4518.02 v1(3080,4530) ; 3007.07,2767.04 3007.07,2715 3007.07,2640 ccw(c3065,2640) 3097.1,2591.77 3153.85,2629.54 ccw(c3140,2650.36) 3157.64,2632.64 X3.4@3165,2640 X3.3@3165,2740
-12_IDC: 
B1: IC4.9 IC6.2 R28.2 SW2.7 X4.1 X5.1 | length 3032.6
  Top Layer w8: v1(2440,4250) 2431.52,4290.03 cw(c2455,4295) 2431,4294.52 2430.01,4344.2 cw(c2470,4345) 2430.01,4346.06 2434.37,4510.38 cw(c2519.71,4508.1) 2434.61,4514.8 2450.56,4717.34 cw(c2519.71,4711.9) 2462.55,4751.19 2577.63,4918.62 cw(c2621.61,4888.39) 2623.09,4941.74 2796.63,4936.94 ccw(c2798.1,4990.29) 2812.08,4938.78 SW2.7@3001.9,4990.29 ; v1(2908,4099.5) 3019.11,3973.39 ccw(c3055.13,4005.13) 3021.2,3971.17 3041.41,3950.96 ccw(c3075.25,3985) 3052.51,3942.73 3114.5,3909.37 cw(c3109.29,3899.69) 3120.29,3899.69 3120.29,3874.19 ccw(c3144.29,3874.19) 3124.99,3859.92 v1(3150.73,3825.12) 3149.79,3821.44 cw(c3142.04,3823.41) 3148.98,3819.44 3118.88,3767.03 ccw(c3160.5,3743.12) 3112.5,3743.12 3112.5,3735.01 cw(c3072.5,3735.01) 3112.29,3730.97 3107.85,3687.09 ccw(c3155.61,3682.22) 3107.61,3682.22 3107.61,3629.3 ccw(c3155.61,3629.3) 3109.07,3617.54 3163.63,3401.52 cw(c3140.36,3395.65) 3164.34,3396.75 v1(3169.93,3275.65) ; v1(2990.36,3825.65) R28.2@3039.22,3825.65
  Bottom Layer w8: X4.1@2405,4130 2454.43,4179.43 ; v1(2440,4250) 2449.84,4186.19 ccw(c2457.75,4187.43) 2452.09,4181.78 2454.43,4179.43 ; v1(2908,4099.5) 2736.43,4113.94 X5.1@2705,4130 2673.57,4146.06 2630.76,4172.19 ccw(c2605,4130) 2605,4179.43 2454.43,4179.43 ; v1(2990.36,3825.65) 3046.57,3825.65 IC6.2@3073.08,3820.65 ; IC6.2@3075.36,3820.65 3099.59,3825.12 v1(3150.73,3825.12) ; v1(3169.93,3275.65) IC4.9@3287.65,3275.65
B2: IC4.10 IC6.3 SW2.6 X4.2 X5.2 | length 2953.8
  Top Layer w8: X4.2@2505,4130 v1(2400,4220) 2399.78,4220.22 cw(c2405.44,4225.87) 2397.45,4225.54 2376.05,4763.45 cw(c2415,4765) 2376.02,4765 2376.02,4965 cw(c2415,4965) 2416.4,5003.96 SW2.6@2798.1,4990.29 ; v1(2946.63,4102.28) 2981.97,4041.88 ccw(c3009.59,4058.04) 2985.34,4037.16 3030.87,3984.25 ccw(c3055.13,4005.13) 3032.45,3982.55 3052.68,3962.32 ccw(c3075.25,3985) 3060.12,3956.8 3122.05,3923.48 cw(c3109.29,3899.69) 3135.68,3905.42 3141.41,3879.03 ccw(c3149.23,3880.73) 3143.15,3875.53 v1(3144.29,3874.19) ; v1@3144.62,3874.19 v1(3144.29,3874.19) ; v1(3189.93,3225.65) 3193.85,3273.69 ccw(c3169.93,3275.65) 3193.78,3278.32 3180.11,3400.11 ccw(c3140.36,3395.65) 3179.14,3405.44 3124.59,3621.42 cw(c3155.61,3629.3) 3123.61,3629.3 3123.61,3682.22 cw(c3155.61,3682.22) 3123.77,3685.49 3128.21,3729.34 ccw(c3072.5,3735.01) 3128.5,3735.01 3128.5,3743.12 cw(c3160.5,3743.12) 3134.33,3761.54 3151.83,3786.41 cw(c3178,3768) 3152.34,3787.12 3169.97,3810.78 ccw(c3150.73,3825.12) 3170.2,3839.14 3146.65,3872.01 ccw(c3140.15,3867.35) v1(3144.29,3874.19)
  Bottom Layer w8: X4.2@2505,4130 X5.2@2605,4130 2679.8,4082.73 ccw(c2687.28,4094.57) 2686.95,4080.57 2907.45,4075.5 ccw(c2908,4099.5) 2924.19,4081.78 v1(2946.63,4102.28) ; IC6.3@3075.36,3870.65 3099.59,3874.19 v1(3144.29,3874.19) ; v1(3189.93,3225.65) IC4.10@3287.65,3225.65
B3: IC4.11 IC6.4 SW2.5 X4.3 X5.3 | length 2846.5
  Top Layer w8: X4.3@2405,4030 2480.56,4072.97 cw(c2505,4030) 2497.58,4078.87 2512.42,4081.13 ccw(c2505,4130) 2546.2,4157.31 2455.41,4294.31 cw(c2462.09,4298.7) v1(2455,4295) 2454.97,4295.06 cw(c2462.1,4298.7) 2454.22,4297.28 2446.38,4340.74 cw(c2470,4345) 2446.01,4345.64 2450.37,4509.94 cw(c2519.71,4508.1) 2450.56,4513.55 2466.51,4716.09 cw(c2519.71,4711.9) 2482.1,4749.76 SW2.5@2621.61,4888.39 ; v1(2985.59,4098.45) 2996.71,4066.39 ccw(c3050.09,4084.91) 2999.46,4059.83 3004.37,4049.91 ccw(c3055,4075) 3015,4035.1 3065.8,3984.3 ccw(c3105.7,4024.3) 3074.36,3977.29 3156,3922.9 cw(c3151.56,3916.25) 3159.51,3917.2 v1(3159.56,3916.74) 3159.68,3916.29 ccw(c3167.44,3918.21) 3159.94,3915.43 3188.24,3839.01 cw(c3150.73,3825.12) 3188.25,3811.27 3142.1,3686.18 ccw(c3179.61,3672.28) 3140.48,3663.95 3195.13,3407.31 cw(c3140.36,3395.65) 3196.02,3401.87 3209.67,3280.18 cw(c3169.93,3275.65) 3209.81,3278.8 3213.85,3227.54 cw(c3189.93,3225.65) 3213.65,3221.99 v1(3206.5,3175.65)
  Bottom Layer w8: X4.3@2405,4030 2480.56,4072.97 cw(c2505,4030) 2505,4079.43 2605,4079.43 cw(c2605,4030) 2629.44,4072.97 X5.3@2705,4030 2707.12,4030 ccw(c2707.12,4038) 2708.26,4030.08 2913.75,4059.91 ccw(c2908,4099.5) 2927.1,4064.35 2958.09,4081.2 ccw(c2946.63,4102.28) 2959.42,4081.97 v1(2985.59,4098.45) ; IC6.4@3075.36,3920.65 3099.59,3916.74 v1(3159.56,3916.74) ; v1(3206.5,3175.65) IC4.11@3287.65,3175.65